# Altium PCB PWB.PcbDoc (part 3 of 5)
Units mm, origin at the board's own origin, x right, y up, seen from the top; angles counter-clockwise.
Board outline 202 x 125 mm, 2 copper layers (Top Layer, Bottom Layer), stack 1.576 mm thick; 208 components, 124 nets, 630 pads, 5440 vias.
Unrouted connection lines stored in the file: 98.
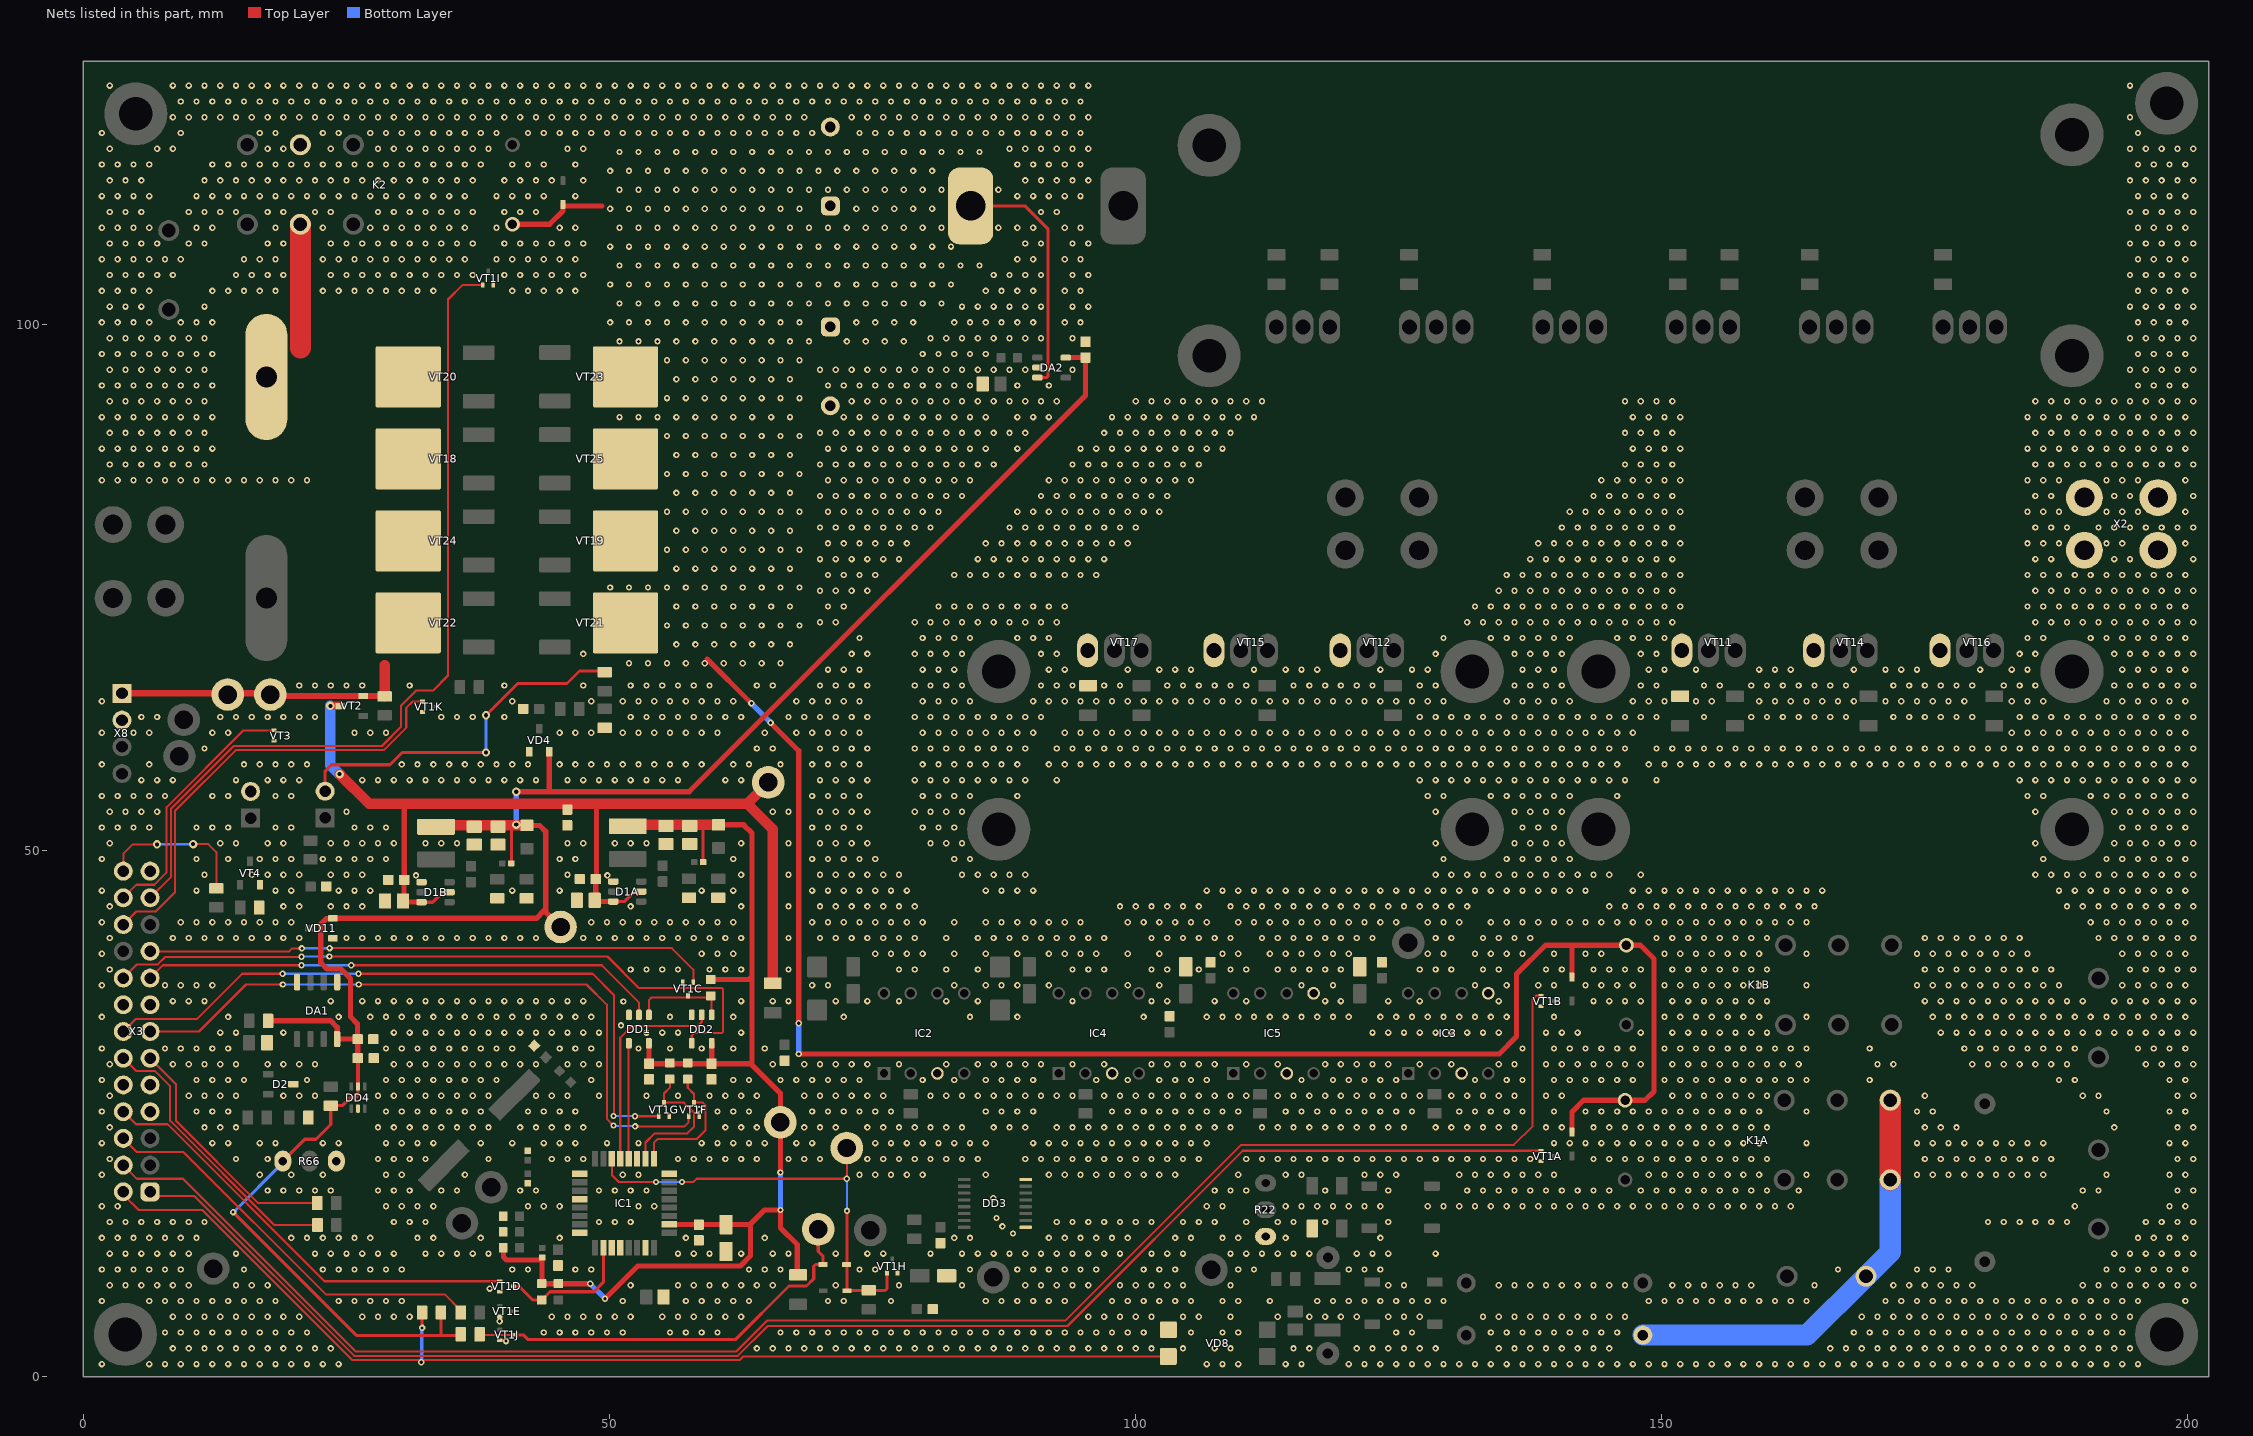
[diagram p2: the nets of this part, all layers, seen from the top]

## Part data (continued)
R31: library part RC0805JR-073K3L, "3.3 kOhms ±5%, 1/8W 0805 Thick Film Resistor", Manufacturer=Yageo, Package=0805, Power Rating=0.125W, Temperature Range="-55°C ~ 155°C", Temperature Stability=±100ppm/°C, Tolerance=±1%, Voltage=150V, Ajax_1C_ID=9030, Ajax_1C_PN="3.3k 5% 0805 Resistors SMD RoHS", Ajax_1С_Status="RND Only", Component Status=Released, Component Type=SMD, ComponentLink1Description=Datasheet, ComponentLink1URL=https://eu.mouser.com/datasheet/2/447/PYu_RC_Group_51_RoHS_L_10-1664068.pdf, GUID_1C=cb9785ec-9b47-11e6-8242-d8cb8a9acc66, Part Number=RC0805JR-073K3L, Part Type="Thick Film", Price=0,001081, Replacement=NONE
R34 R35 R36 R38 R39 R40 R45 R46 R47 R48 R49 R50: library part RC1206FR-074R7L, "4.7 Ohms ±1%, 1/4W 1206 Thick Film Resistor", Manufacturer=Yageo, Package=1206, Power Rating=0.25W, Supplier Part Number 1=311-4.70FRTR-ND, Temperature Range="-55°C ~ 155°C", Temperature Stability=±200ppm/°C, Tolerance=±1%, Voltage=200V, Ajax_1C_ID=32212, Ajax_1C_PN="4.7R 1% 1206 0.25W Resistors SMD RoHS", Ajax_1С_Status="Mass Production", Component Status=Released, Component Type=SMD, ComponentLink1Description=Datasheet, ComponentLink1URL=https://eu.mouser.com/datasheet/2/447/PYu_RC_Group_51_RoHS_L_11-1984063.pdf, GUID_1C=de4b8aaa-eaef-11eb-ab74-0050569f2651, Part Number=RC1206FR-074R7L, Part Type="Thick Film", Price=0,0021, Replacement=NONE, Supplier 1=Digi-Key
R37 R41 R51 R52: library part RC1206JR-0710KL, "10 kOhms ±5% 1/4W 1206 Thick Film Resistor", Manufacturer=Yageo, Package=1206, Power Rating=0.25W, Supplier Part Number 1=311-10KERTR-ND, Temperature Range="-55°C ~ 155°C", Temperature Stability=±100ppm/°C, Tolerance=±5%, Voltage=200V, Ajax_1C_ID=29423, Ajax_1C_PN="10k 5% 1206 Resistors SMD RoHS", Ajax_1С_Status="RND Only", Component Status=Released, Component Type=SMD, ComponentLink1Description=Datasheet, ComponentLink1URL=https://eu.mouser.com/datasheet/2/447/PYu_RC_Group_51_RoHS_L_11-1984063.pdf, GUID_1C=e3e7c694-a8f0-11eb-ab74-0050569f2651, Part Number=RC1206JR-0710KL, Part Type="Thick Film", Price=0,0018, Replacement=NONE, Supplier 1=Digi-Key
R42: library part RC0805FR-071KL, "1 kOhms ±1%, 1/8W 0805 Thick Film Resistor", Manufacturer=Yageo, Package=0805, Power Rating=0.125W, Supplier Part Number 1=311-1.00KCRTR-ND, Temperature Range="-55°C ~ 155°C", Temperature Stability=±100ppm/°C, Tolerance=±1%, Voltage=150V, Ajax_1C_ID=8520, Ajax_1C_PN="1k 1% 0805 Resistors SMD RoHS", Ajax_1С_Status="Mass Production", Component Status=Released, Component Type=SMD, ComponentLink1Description=Datasheet, ComponentLink1URL=https://eu.mouser.com/datasheet/2/447/PYu_RC_Group_51_RoHS_L_10-1664068.pdf, GUID_1C=0c53a8ec-2890-11e6-81ae-d8cb8a9acc66, Part Number=RC0805FR-071KL, Part Type="Thick Film", Price=0,0014, Replacement=NONE, Supplier 1=Digi-Key
R44: library part RC0603JR-071KL, "1 kOhms ±5%, 1/10W 0603 Thick Film Resistor", Manufacturer=Yageo, Package=0603, Power Rating=0.1W, Supplier Part Number 1=311-1.0KGRTR-ND, Temperature Range="-55°C ~ 155°C", Temperature Stability=±100ppm/°C, Tolerance=±5%, Voltage=75V, Ajax_1C_ID=28124, Ajax_1C_PN="1k 5% 0603 Resistors SMD RoHS", Ajax_1С_Status="Mass Production", Component Status=Released, Component Type=SMD, ComponentLink1Description=Datasheet, ComponentLink1URL=https://eu.mouser.com/datasheet/2/447/PYu_RC_Group_51_RoHS_L_11-1984063.pdf, GUID_1C=fbc5fd6b-8d66-11eb-ab70-0050569f2651, Part Number=RC0603JR-071KL, Part Type="Thick Film", Price=0,00072, Replacement=NONE, Supplier 1=Digi-Key
R53 R54: library part RC1206JR-070RL, "0 Ohms Jumper, 1/4W 1206 Thick Film Resistor", Manufacturer=Yageo, Package=1206, Power Rating=0.25W, Supplier Part Number 1=311-0.0ERTR-ND, Temperature Range="-55°C ~ 155°C", Temperature Stability=NONE, Tolerance=±5%, Voltage=200V, Ajax_1C_ID=5515, Ajax_1C_PN="0R 5% 1206 Resistors SMD RoHS", Ajax_1С_Status="Mass Production", Component Status=Released, Component Type=SMD, ComponentLink1Description=Datasheet, ComponentLink1URL=https://eu.mouser.com/datasheet/2/447/PYu_RC_Group_51_RoHS_L_10-1664068.pdf, GUID_1C=96b6e750-6b2e-11e4-9c1d-a45d36c4a9e5, Part Number=RC1206JR-070RL, Part Type="Thick Film", Price=0,0018, Replacement=NONE, Supplier 1=Digi-Key
R56 R57: library part MOR200SJTB-10R, "150k Ohm ±5%, 2W d4.0mm L11mm Axial Through Hole, Metal Oxide Resistor, Al2O3", Manufacturer=Hitano, Package="Axial 4.0mm, L11mm", Power Rating=2W, Supplier Part Number 1=13878, Temperature Range="-55°C ~ 200°C", Temperature Stability=±250ppm/°C, Tolerance=±5%, Voltage=500V, Ajax_1C_ID=17914, Ajax_1C_PN="150k 5% 2W (MOR200SJTB-10R-Hitano) резистор выводной pcs", Ajax_1С_Status="RND Only", Component Status=Released, Component Type=PTH, ComponentLink1Description=Datasheet, ComponentLink1URL=\\altiumdb.ajax.local\files\Datasheet\Passive\MOR_20160329.pdf, GUID_1C=857e103f-078d-11ea-ab58-0050569f2651, Part Number=MOR200SJTB-10R, Part Type="Metal Oxide Film", Price=0,05250406, Replacement=NONE, Supplier 1=RKS
R60: library part ERJ-P06J121V, "120 Ohms ±5%, 1/2W 0805 Thick Film Resistor", Manufacturer=Yageo, Package=0805, Power Rating=0.5W, Supplier Part Number 1=P120ADTR-ND, Temperature Range="-55°C ~ 155°C", Temperature Stability=±200ppm/°C, Tolerance=±5%, Voltage=400V, Ajax_1C_ID=19445, Ajax_1C_PN="120R 5% 1/2W 0805 ERJ-P06J121V Panasonic Resistors SMD RoHS", Ajax_1С_Status="Mass Production", Component Status=Released, Component Type=SMD, ComponentLink1Description=Datasheet, ComponentLink1URL=https://industrial.panasonic.com/cdbs/www-data/pdf/RDO0000/AOA0000C331.pdf, GUID_1C=e6cc71c1-57d9-11ea-ab5b-0050569f2651, Part Number=ERJ-P06J121V, Part Type="Thick Film / Anti-Surge/Pulse Withstanding", Price=0,02100084, Replacement=NONE, Supplier 1=Digi-Key
TP1 TP2: "0.96mm Pad for Plug-In or Receptacle", Manufacturer=NONE, Ajax_1C_PN=NONE, Ajax_1С_Status="RND Only", Component Status=Released, Component Type=PTH, ComponentLink1Description=Datasheet, ComponentLink1URL=NONE, Part Number=PAD-0.96mm, Part Type=Pad, Price=NONE, Replacement=NONE, Temperature Range=NONE
VD1 VD7: "1A, 600V Standard Bridge Rectifier, ABS Package", Current=1A, Manufacturer="Taiwan Semiconductor", Package=ABS, Supplier Part Number 1=821-ABS6H, Temperature Range="-55°C ~ 150°C", Voltage=600V, Ajax_1C_ID=34652, Ajax_1C_PN="ABS6H 600V 1A Bridge Rectifier LGE ABS", Ajax_1С_Status="RND Only", Component Status=Released, Component Type=SMD, ComponentLink1Description=Datasheet, ComponentLink1URL="\\altiumdb.ajax.local\files\Datasheet\Diodes\ABS2 SERIES_M2103.pdf", GUID_1C=734c9af7-1f64-11ec-ab76-0050569f2651, Marking=ABS6H, Part Number=ABS6H, Part Type=Array, Price=0,0254, Replacement=NONE, Supplier 1=Mouser, Vf="0.95V @ 0.4A"
VD2 VD3: "Diode Schottky 10V 3A, SOD-323", Current=3A, Manufacturer=STMicroelectronics, Package=SOD-323, Supplier Part Number 1=497-3707-2-ND, Temperature Range="-65°C ~ 150°C", Voltage=10V, Ajax_1C_ID=4777, Ajax_1C_PN="BAT60JFILM SOD-323 ST Диод", Ajax_1С_Status="Mass Production", Component Status=Released, Component Type=SMD, ComponentLink1Description=Datasheet, ComponentLink1URL=http://www.st.com/content/ccc/resource/technical/document/datasheet/3d/d2/27/1d/20/e3/4d/48/CD00001944.pdf/files/CD00001944.pdf/jcr:content/translations/en.CD00001944.pdf, GUID_1C=a9f1f773-fd28-11e3-b679-a45d36c4a9e5, Marking=60, Part Number=BAT60JFILM, Part Type=Schottky, Price=0, Replacement=NONE, Standard Lead Time="17 Weeks", Supplier 1=Digi-Key, Vf="580mV @ 1A"
VD4 VD11: "Diode Array 1 Pair Series Connection Standard 85V 160mA, 5nA Reverse Current, SOT-23", Current=160mA, Manufacturer="Diodes Incorporated", Package=SOT-23, Supplier Part Number 1=621-BAV199-F, Temperature Range="-65°C ~ 150°C", Voltage=85V, Ajax_1C_ID=25391, Ajax_1C_PN="BAV199-7-F (SOT-23) диод", Ajax_1С_Status="RND Only", Component Status=Released, Component Type=SMD, ComponentLink1Description=Datasheet, ComponentLink1URL=https://eu.mouser.com/datasheet/2/115/DIOD_S_A0008363444_1-2543096.pdf, GUID_1C=0951ac93-5400-11eb-ab6e-0050569f2651, Marking=K52, Part Number=BAV199-7-F, Part Type=Array, Price=0,022, Replacement=NONE, Standard Lead Time="30 Weeks", Supplier 1=Mouser, Vf="1.25V @ 150 mA"
VD5 VD6: "Diode Standard 1000V 1A, 75ns, SMA", Current=1A, Manufacturer="Diodec Semiconductor", Package=SMA, Temperature Range="-50°C ~ 150°C", Voltage=1000V, Ajax_1C_ID=20461, Ajax_1C_PN="US1M-DIO 1.0A 1000V 75ns, диод", Ajax_1С_Status="Mass Production", Component Status=Released, Component Type=SMD, ComponentLink1Description=Datasheet, ComponentLink1URL=https://diotec.com/request/datasheet/us1a.pdf, GUID_1C=3d137b04-96a6-11ea-ab61-0050569f2651, Marking=US1M, Part Number=US1M, Part Type=General, Price=0,02875902, Replacement=NONE, Supplier 1=Arrow, Supplier Part Number 1=US1M, Vf="1.7V @ 1A"
VD8: "1-Channel Photocoupler, 5kV, 130-260% CTR, SSOP-4", Color=NONE, Manufacturer="Everlight Electronics", Package=SSOP-4, Temperature Range="-55°C ~ 110°C", Ajax_1C_ID=34526, Ajax_1C_PN="EL817S1(B)(TU)-F Optocoupler IC Everlight SMD-4", Ajax_1С_Status="RND Only", Component Status="On Review", Component Type=SMD, ComponentLink1Description=Datasheet, ComponentLink1URL=\\altiumdb.ajax.local\files\Datasheet\Opto\el817-Everlight.pdf, GUID_1C=2965953f-1c55-11ec-ab76-0050569f2651, Part Number=EL817S1(B)(TU)-F, Part Type=Optocoupler, Price=0,04209091, Replacement=NONE, Supplier 1=Arrow, Supplier Part Number 1=EL817S1(B)(TU)-F, Wavelength=NONE
VD9A VD9B VD14: "Diode Standard 75V 150mA, SOD-323F", Current=150mA, Manufacturer="Diodec Semiconductor", Package=SOD-323, Supplier Part Number 1=1N4148WS-DIO, Temperature Range="-55°C ~ 150°C", Voltage=75V, Ajax_1C_ID=10255, Ajax_1C_PN="1N4148WS diotec SOD-323", Ajax_1С_Status="Mass Production", Component Status=Released, Component Type=SMD, ComponentLink1Description=Datasheet, ComponentLink1URL=https://diotec.com/tl_files/diotec/files/pdf/datasheets/1n4148ws.pdf, GUID_1C=3d8ac204-519f-11e7-8106-14dda9d2d04d, Marking=W2, Part Number=1N4148WS, Part Type="Fast Switching", Price=0,00864, Replacement=1N4148WS-E, Standard Lead Time=NONE, Supplier 1=TME, Vf="1V @ 50mA"
VD10: "Zener Diode 5.1V, 1W, ±5%, 5uA Reverse Current, DO-213AB", Manufacturer="Vishay Semiconductor", Package=DO-213AB, Supplier Part Number 1=625-ZM4757A, Temperature Range="-65°C ~ 175°C", Voltage=5.1V, Ajax_1C_ID=43362, Ajax_1C_PN="ZM4757A-GS08 стабилитрон 2,6*5,2 51V 1W", Ajax_1С_Status="Mass Production", Component Status=Released, Component Type=SMD, ComponentLink1Description=Datasheet, ComponentLink1URL=https://eu.mouser.com/datasheet/2/427/zm4728a-1767906.pdf, GUID_1C=ea8fe24c-db72-11ec-a361-005056994834, Part Number=ZM4757A-GS08, Part Type=Zener, Price=0,07370924, Replacement=NONE, Standard Lead Time="27 Weeks", Supplier 1=Mouser
VT1A VT1B VT1C VT1D VT1E VT1F VT1G VT1H VT1I VT1J VT1K VT3: "50V, 100mA Low Vce(sat) NPN Digital Transistor, Pre-Biased 4.7k/47k (with built-in resistors)", Manufacturer=Onsemi, Package=SC-75, Supplier Part Number 1=DTC143ZET1GOSTR-ND, Temperature Range="-55°C ~ 150 °C", Ajax_1C_ID=9410, Ajax_1C_PN="DTC143ZET1G SC-75-3  биполярный NPN транзистор", Ajax_1С_Status="Mass Production", Component Status=Released, Component Type=SMD, ComponentLink1Description=Datasheet, ComponentLink1URL=http://www.onsemi.com/pub/Collateral/DTC143Z-D.PDF, GUID_1C=d76ac5d5-de69-11e6-829b-d8cb8a9acc66, Ic=100mA, Part Number=DTC143ZET1G, Part Type=NPN, Price=0,0125, Replacement=NONE, Standard Lead Time="8 Weeks", Supplier 1=Digi-Key, Vce=50V
VT2: "-30V, -3.6A max P-Channel HEXFET MOSFET, 82mOhm @ Vgs = -4.5V", Manufacturer="Infineon Technologies", Package=SOT-23, Temperature Range="-55°C ~ 150°C", Ajax_1C_ID=18293, Ajax_1C_PN="IRLML9301TRPBF SOT-23-3", Ajax_1С_Status="RND Only", Component Status=Released, Component Type=SMD, ComponentLink1Description=Datasheet, ComponentLink1URL=https://eu.mouser.com/datasheet/2/196/Infineon_IRLML9301_DataSheet_v01_01_EN-1732998.pdf, GUID_1C=9e524eff-1dcc-11ea-ab59-0050569f2651, Id=3.6A, Part Number=IRLML9301TRPbF, Part Type=P-Channel, Price=0,12469714, RDS=103mOhm, Replacement=NONE, Standard Lead Time="77 Weeks", Supplier 1=Mouser, Supplier Part Number 1=IRLML9301TRPbF, Vds=30V
VT4: library part IRLML6344TRPBF, "30V, 5A max N-Channel HEXFET MOSFET, 29mOhm @ Vgs = 4.5V", Manufacturer="Infineon Technologies", Package=SOT-23, Supplier Part Number 1=IRLML6344TRPBFTR-ND, Temperature Range="-55°C ~ 150°C", Ajax_1C_ID=9416, Ajax_1C_PN="IRLML6344TRPBF  SOT23. полевой транзистор", Ajax_1С_Status="RND Only", Component Status=Released, Component Type=SMD, ComponentLink1Description=Datasheet, ComponentLink1URL=https://www.infineon.com/dgdl/irlml6344pbf.pdf?fileId=5546d462533600a4015356689c44262c, GUID_1C=8299d48f-df0c-11e6-829c-d8cb8a9acc66, Id=5A, Part Number=IRLML6344TRPBF, Part Type=N-Channel, Price=0,11485255, RDS=37mOhm, Replacement=NONE, Standard Lead Time="16 Weeks", Supplier 1=Digi-Key, Vds=30V
VT6 VT7 VT8 VT9 VT10 VT11 VT12 VT13 VT14 VT15 VT16 VT17: library part MOSFET_N_123, CurrentDS=7A, InputCapacitor=756pF, Manufacturer="Infineon Technologies", MaxPower=2.5W, Package=8-TDSON, PartNumber=IRFXXX, Temperature=-55...+150°C, VoltageDS=80V, GateCharge=9.1nC, HelpURL=https://www.digikey.com/product-detail/en/infineon-technologies/BSC340N08NS3GATMA1/BSC340N08NS3GATMA1TR-ND/2080655, RDS=34mOhm, TypeTransistor="MOSFET N-channel transistor", ValueManufacturerPartNumber="MOSFET N-channel transistor, 80V, 7A, 9.1nC, 2.5W, 34mOhm, 756pF, 8-TDSON, -55...+150°C"
VT18 VT19 VT20 VT21 VT22 VT23 VT24 VT25: "-40V, -7.2A max P-Channel Enhancement MOSFET, 59mOhm @ Vgs = -4.5V", Manufacturer="Diodes Incorporated", Package=D-Pak, Supplier Part Number 1=DMP4051LK3-13DITR-ND, Temperature Range="-55°C ~ 150°C", Ajax_1C_ID=18605, Ajax_1C_PN="DMP4051LK3 40V, 0,05Ohm P-chanel Power HEXFET", Ajax_1С_Status="Mass Production", Component Status=Released, Component Type=SMD, ComponentLink1Description=Datasheet, ComponentLink1URL=https://www.diodes.com/assets/Datasheets/DMP4051LK3.pdf, GUID_1C=9abe91dd-36a9-11ea-ab5a-0050569f2651, Id=7.2A, Part Number=DMP4051LK3-13, Part Type=P-Channel, Price=0,1628, RDS=85mOhm, Replacement=NONE, Standard Lead Time="30 Weeks", Supplier 1=Digi-Key, Vds=40V
X1 X2 X5 X6: library part Connector_single_power, TypeConnector="Power connector", ValueManufacturerPartNumber="Power connector, *, *"
  X1: CommentText="АКБ +"
  X2: CommentText="АКБ -"
  X5: CommentText=TR1
X3: "2.54mm Vertical Box Header, Two Rows, 26 Pin, 20mOhm max, Male IDC BH-26", Manufacturer=Connfly, Temperature Range="-40°C ~ 105°C", Ajax_1C_ID=14527, Ajax_1C_PN="BH-26 : Вилка в плату IDC : IDC-26", Ajax_1С_Status="RND Only", Component Status=Released, Component Type=PTH, ComponentLink1Description=Datasheet, ComponentLink1URL=\\altiumdb.ajax.local\files\Datasheet\Connectors\DS1013.pdf, GUID_1C=b61e51fd-0757-11e9-ab4d-0050569f2651, Part Number=DS1013-26SSIB1-3A, Part Type="IDC (Box Header) / Vertical", Price=0,1, Replacement=NONE
X4 X7 X9 X12: library part DG300-7.5-02P-11-00AH, "Screw Terminal, 7.5mm Pitch, 2 pin, Grey", Manufacturer=Degson, Supplier Part Number 1=DG300-7.5-2P11, Temperature Range="-30°C ~ 120°C", Ajax_1C_ID=14664, Ajax_1C_PN=DG300-7.5-02P-11-00AH, Ajax_1С_Status="RND Only", Component Status=Released, Component Type=PTH, ComponentLink1Description=Datasheet, ComponentLink1URL=https://www.tme.eu/Document/adcdc895102d44b158b752608cb08ff1/DG300-5.0.pdf, GUID_1C=80a5b435-17ec-11e9-ab4d-0050569f1984, Part Number=DG300-7.5-02P-11-00AH, Part Type=Terminal, Price=0,108, Replacement=NONE, Supplier 1=TME
X8: library part CI3104P1V00, "WH Series 2.54mm Wire to Board Straight DIP Type Headers, 4 Pin", Manufacturer=CviLux, Temperature Range="-25℃ ~ 85℃", Ajax_1C_ID=1232, Ajax_1C_PN="WF-04S, разъем 4 пина \"папа\", на плату", Ajax_1С_Status="RND Only", Component Status=Released, Component Type=PTH, ComponentLink1Description=Datasheet, ComponentLink1URL=\\altiumdb.ajax.local\files\Datasheet\Connectors\CI3102S.pdf, GUID_1C=2c368b74-dd41-11e0-af93-6c626deda1bb, Part Number=CI3104P1V00, Part Type="Wire-to-Board / Header", Price=0,01936, Replacement=NONE
X10 X11: library part CI3102P1V00, "WH Series 2.54mm Wire to Board Straight DIP Type Headers, 2 Pin", Manufacturer=CviLux, Temperature Range="-25℃ ~ 85℃", Ajax_1C_ID=6817, Ajax_1C_PN="WF-02S (DS1070-2M) Штекер \"папа\"; 2 контакта; шаг 2.54мм; прямой; на плату", Ajax_1С_Status="RND Only", Component Status=Released, Component Type=PTH, ComponentLink1Description=Datasheet, ComponentLink1URL=\\altiumdb.ajax.local\files\Datasheet\Connectors\CI3102S.pdf, GUID_1C=74812bc3-35d6-11e5-ad28-a45d36c4a9e5, Part Number=CI3102P1V00, Part Type="Wire-to-Board / Header", Price=0,016, Replacement=NONE
ZQ1: "12MHz, 18pF, ±30ppm, 40Ohm ESR, 1mW DL Crystal Quartz", Frequency=12MHz, Frequency Stability=±30ppm, Load Capacitance=18pF, Manufacturer="Cardinal Components Inc.", Supplier Part Number 1=370-1146-2-ND, Temperature Range="-40°C ~ 85 °C", Ajax_1C_ID=28125, Ajax_1C_PN="12.000 MHz 30ppm 18pF CSM4Z-A2B3C3-40-12.0D18 кварцевый резонатор", Ajax_1С_Status="RND Only", Component Status=Released, Component Type=SMD, ComponentLink1Description=Datasheet, ComponentLink1URL=https://www.cardinalxtal.com/uploads/files/csm4-csm5.pdf, Frequency Tolerance=±30ppm, GUID_1C=0d925abc-8d67-11eb-ab70-0050569f2651, Part Number=CSM4Z-A2B3C3-40-12.0D18, Part Type=Crystal, Price=0,505, Replacement=NONE, Standard Lead Time="8 Weeks", Supplier 1=Digi-Key
SH1: link=http://www.cnchog.com/products/40a-220a-ID167.html

## Free pads (board coordinates)
  round 6 hole 3.2: 0(4,4) 0(5,120) 0(87,52) 0(87,67) 0(107,97) 0(107,117) 0(132,52) 0(132,67) 0(144,52) 0(144,67) 0(189,52) 0(189,67) 0(189,97) 0(189,118) 0(198,4) 0(198,121)

## Via types
v1: diameter 0.6, hole 0.3, Top Layer to Bottom Layer, tented both sides, 5432 vias
v2: diameter 0.8, hole 0.4, Top Layer to Bottom Layer, tented both sides, 8 vias

## Nets (pads, with @x,y where several pads share a name; then routed paths per layer and width w, separated by ;. In a path a pad name is that pad's centre, name@x,y a point inside that pad or via, vN(x,y) a via of type N, cw(c..) or ccw(c..) an arc to the next point about the centre after c; other vN are vias at no path point)
3V3: C2.2 C4B.1 C5B.1 C35.2 C36.2 DA1.8 DA2.5 DD4.5 FP3.1 HG1B.AN L1B.2 R5.2 R16.1 R17.1 R19.1 R55.1 R66.1 VD4.2 VD11.2 | length 202
  Top Layer w0.3: v1(14.249,15.621) 25.959,3.912 33.96,3.912 ; R66.1@18.974,20.472 21.057,22.555 22.123,22.555 23.52,23.952 R16.1@23.52,25.745 24.627,25.745 25.375,26.492 25.883,26.492 26.111,26.721 DD4.5@26.111,27.568 ; L1B.2@33.528,52.238 L1B.2@33.664,52.373 ; R55.1@33.996,6.096 33.996,3.948 33.96,3.912 ; R17.1@35.484,3.912 33.96,3.912 ; R17.1@35.87,4.004 R17.1@35.879,4.013 ; R5.2@40.653,48.84 40.691,48.878 40.691,52.373
  Top Layer w0.4: DD4.5@26.117,27.612 C36.2@26.117,30.232
  Top Layer w0.5: R19.1@17.551,33.822 23.506,33.822 24.13,33.198 DA1.8@24.13,32.073 C35.2@25.822,32.073 ; C35.2@26.047,32.055 C35.2@26.072,32.055 26.072,33.516 25.4,34.188 25.4,37.826 24.491,38.735 23.165,38.735 22.581,39.319 22.581,43.002 23.074,43.496 23.681,43.496 VD11.2@23.731,43.546 43.063,43.546 43.802,44.285 43.944,44.426 ; C35.2@26.098,32.029 C36.2@26.098,30.251 C36.2@26.117,30.232 ; v2(41.148,55.575) 44.247,55.575 ; HG1B.AN@42.166,52.375 43.382,52.375 43.944,51.813 43.944,44.426 ; VD4.2@44.282,59.377 44.282,55.611 44.247,55.575 ; FP3.1@45.364,42.723 43.944,44.144 43.944,44.426 ; DA2.5@93.378,96.835 95.248,96.835 C2.2@95.25,96.837 95.25,93.243 57.582,55.575 44.247,55.575
  Top Layer w1: L1B.2@33.664,52.373 37.16,52.373 39.421,52.373 40.691,52.373 41.148,52.373 HG1B.AN@42.164,52.373 HG1B.AN@42.166,52.375
  Bottom Layer w0.3: v1(14.249,15.621) 14.286,15.621 18.974,20.309 R66.1@18.974,20.472
  Bottom Layer w0.5: v2(41.148,52.451) v2(41.148,55.575)
5V: C4A.1 C5A.1 C7.1 C8.1 C29.2 C30.2 DD1.5 DD2.5 FB1.1 FP4.1 HG1A.AN IC1.26 L1A.2 R8.2 R9.2 R10.2 R11.2 R12.2 R13.2 R25.2 R53.2 | length 120.6
  Top Layer w0.2: C30.2@53.757,29.823 C30.2@53.848,29.731 ; C29.2@59.675,29.772 C29.2@59.715,29.731 ; 63.436,29.731 63.551,29.616
  Top Layer w0.3: R11.2@43.561,8.827 R11.2@43.599,8.865 ; L1A.2@51.746,52.293 L1A.2@51.881,52.429 ; 58.909,52.429 R8.2@58.909,48.933 ; R8.2@58.909,48.933 58.87,48.895 R8.2@58.909,48.933
  Top Layer w0.5: R25.2@39.916,12.243 39.939,12.22 39.939,11.367 40.231,11.074 43.366,11.074 43.552,11.26 43.567,11.26 FB1.1@43.612,11.305 ; R11.2@43.561,8.827 R10.2@45.161,8.827 45.168,8.82 48.177,8.82 v1(48.184,8.814) ; R11.2@43.599,8.865 FB1.1@43.599,11.074 ; v1(49.581,7.391) 52.697,10.507 62.45,10.507 63.424,11.481 63.424,14.441 ; C30.2@53.757,29.823 DD1.5@53.757,31.67 ; C30.2@53.848,29.731 55.753,29.731 57.379,29.731 59.766,29.731 63.436,29.731 ; IC1.26@55.673,14.459 55.682,14.45 58.487,14.45 C8.1@58.496,14.441 63.361,14.441 64.745,15.824 v1(66.269,15.824) 66.269,14.122 67.864,12.527 67.864,9.736 R53.2@67.945,9.655 ; R13.2@59.664,37.732 63.258,37.732 63.551,38.025 ; C29.2@59.726,29.772 DD2.5@59.726,31.67 ; HG1A.AN@60.382,52.429 62.76,52.429 63.551,51.638 63.551,38.025 ; v1(66.256,19.396) FP4.1@66.256,24.155 66.256,26.911 63.551,29.616 63.551,38.025
  Top Layer w1: L1A.2@51.881,52.429 55.378,52.429 57.639,52.429 58.909,52.429 59.366,52.429 HG1A.AN@60.382,52.429
  Bottom Layer w0.5: v1(48.184,8.814) 48.184,8.801 49.581,7.404 v1(49.581,7.391) ; v1(66.256,19.396) 66.262,19.39 66.262,15.831 v1(66.269,15.824)
12V: C3A.1 C3B.1 C16.1 C17A.2 C17B.2 D1A.3 D1A.5 D1B.3 D1B.5 FP2.1 R54.2 VT2.3 | length 96.6
  Top Layer w0.3: D1B.3@32.15,45.081 33.205,45.081 34.108,45.984 34.764,45.984 D1B.5@34.81,46.031 ; D1A.3@50.368,45.136 51.423,45.136 52.326,46.039 52.982,46.039 D1A.5@53.028,46.086
  Top Layer w0.5: C3B.1@30.39,45.201 30.49,45.301 C3B.1@30.49,45.38 ; C3B.1@30.486,45.384 C3B.1@30.49,45.38 ; C17B.2@30.49,47.207 C3B.1@30.49,45.38 ; C17B.2@30.505,47.347 30.505,54.432 ; D1B.3@32.14,45.091 30.779,45.091 C3B.1@30.49,45.38 ; C3A.1@48.608,45.256 48.708,45.356 C3A.1@48.708,45.435 ; C3A.1@48.704,45.439 C3A.1@48.708,45.435 ; C17A.2@48.708,47.263 C3A.1@48.708,45.435 ; C17A.2@48.778,47.263 48.778,54.432 ; D1A.3@50.358,45.146 48.997,45.146 C3A.1@48.708,45.435
  Top Layer w0.8: v2(23.495,63.729) VT2.3@24.402,63.729
  Top Layer w1: v2(24.359,57.252) 27.178,54.432 30.505,54.432 48.778,54.432 63.094,54.432 ; FP2.1@65.1,56.439 63.094,54.432 ; R54.2@65.532,37.316 65.532,51.994 63.284,54.242 63.094,54.432
  Bottom Layer w1: v2(23.495,63.729) 23.495,58.115 v2(24.359,57.252)
+V_BRIDGE: C12.1 C13.1 DA2.3 K1A.1 K1B.1 K2.1 R1.2 SH1.1 VD9A.CA VD9B.CA VD14.CA VT19.2 VT21.2 VT23.2 VT25.2 X10.2 | length 224.4
  Top Layer w0.3: X10.2@22.987,55.626 22.987,57.531 23.597,58.141 29.159,58.141 30.328,59.309 v2(38.278,59.309) ; v2(38.278,62.84) 41.3,65.862 45.974,65.862 47.168,67.056 49.439,67.056 R1.2@49.555,66.94 ; SH1.1@84.328,111.252 89.484,111.252 91.694,109.042 91.694,95.111 91.518,94.935 DA2.3@90.678,94.935
  Top Layer w0.5: K2.1@40.794,109.504 44.328,109.504 45.593,110.769 VD14.CA@45.593,111.247 ; VD14.CA@45.593,111.397 VD14.CA@45.593,111.247 ; 49.276,111.252 48.165,111.252 48.17,111.247 VD14.CA@45.593,111.247 ; 59.273,68.181 59.287,68.181 63.486,63.983 v1(63.5,63.983) ; v1(65.329,62.128) 67.996,59.461 v1(67.996,33.579) ; v1(67.996,30.658) 134.569,30.658 136.22,32.309 136.22,38.252 138.959,40.991 141.453,40.991 ; VD9A.CA@141.478,23.223 141.478,25.146 142.591,26.259 K1A.1@146.531,26.259 148.433,26.259 149.276,27.102 149.276,39.7 147.985,40.991 K1B.1@146.658,40.991 141.453,40.991 ; VD9B.CA@141.478,37.955 141.478,40.966 141.453,40.991
  Bottom Layer w0.3: v2(38.278,59.309) v2(38.278,62.84)
  Bottom Layer w0.5: v1(63.5,63.983) 63.5,63.97 65.329,62.141 v1(65.329,62.128) ; v1(67.996,30.658) v1(67.996,33.579)
  other v1: 51.872,67.78 53.672,67.78 55.472,67.78 57.272,67.78 59.072,67.78 60.872,67.78 62.672,67.78 64.472,67.78 66.272,67.78 56.372,69.58 58.172,69.58 59.972,69.58 61.772,69.58 63.572,69.58 65.372,69.58 67.172,69.58 55.472,71.38 57.272,71.38 59.072,71.38 60.872,71.38 62.672,71.38 64.472,71.38 66.272,71.38 68.072,71.38 56.372,73.18 58.172,73.18 59.972,73.18 61.772,73.18 63.572,73.18 65.372,73.18 67.172,73.18 50.072,74.98 51.872,74.98 53.672,74.98 55.472,74.98 57.272,74.98 59.072,74.98 60.872,74.98 62.672,74.98 64.472,74.98 66.272,74.98 68.072,74.98 56.372,76.78 58.172,76.78 59.972,76.78 61.772,76.78 63.572,76.78 65.372,76.78 67.172,76.78 55.472,78.58 57.272,78.58 59.072,78.58 60.872,78.58 62.672,78.58 64.472,78.58 66.272,78.58 68.072,78.58 56.372,80.38 58.172,80.38 59.972,80.38 61.772,80.38 63.572,80.38 65.372,80.38 67.172,80.38 55.472,82.18 57.272,82.18 59.072,82.18 60.872,82.18 62.672,82.18 64.472,82.18 66.272,82.18 68.072,82.18 56.372,83.98 58.172,83.98 59.972,83.98 61.772,83.98 63.572,83.98 65.372,83.98 67.172,83.98 55.472,85.78 57.272,85.78 59.072,85.78 60.872,85.78 62.672,85.78 64.472,85.78 66.272,85.78 68.072,85.78 56.372,87.58 58.172,87.58 59.972,87.58 61.772,87.58 63.572,87.58 65.372,87.58 67.172,87.58 55.472,89.38 57.272,89.38 59.072,89.38 60.872,89.38 62.672,89.38 64.472,89.38 66.272,89.38 68.072,89.38 50.972,91.18 52.772,91.18 54.572,91.18 56.372,91.18 58.172,91.18 59.972,91.18 61.772,91.18 63.572,91.18 65.372,91.18 67.172,91.18 55.472,92.98 57.272,92.98 59.072,92.98 60.872,92.98 62.672,92.98 64.472,92.98 66.272,92.98 68.072,92.98 56.372,94.78 58.172,94.78 59.972,94.78 61.772,94.78 63.572,94.78 65.372,94.78 67.172,94.78 55.472,96.58 57.272,96.58 59.072,96.58 60.872,96.58 62.672,96.58 64.472,96.58 66.272,96.58 68.072,96.58 50.972,98.38 52.772,98.38 54.572,98.38 56.372,98.38 58.172,98.38 59.972,98.38 61.772,98.38 63.572,98.38 65.372,98.38 67.172,98.38 68.972,98.38 72.572,98.38 74.372,98.38 76.172,98.38 77.972,98.38 50.072,100.18 51.872,100.18 53.672,100.18 55.472,100.18 57.272,100.18 59.072,100.18 60.872,100.18 62.672,100.18 64.472,100.18 66.272,100.18 68.072,100.18 73.472,100.18 75.272,100.18 77.072,100.18 78.872,100.18 50.972,101.98 52.772,101.98 54.572,101.98 56.372,101.98 58.172,101.98 59.972,101.98 61.772,101.98 63.572,101.98 65.372,101.98 67.172,101.98 68.972,101.98 70.772,101.98 72.572,101.98 74.372,101.98 76.172,101.98 77.972,101.98 79.772,101.98 81.572,101.98 50.072,103.78 51.872,103.78 53.672,103.78 55.472,103.78 57.272,103.78 59.072,103.78 60.872,103.78 62.672,103.78 64.472,103.78 66.272,103.78 68.072,103.78 69.872,103.78 71.672,103.78 73.472,103.78 75.272,103.78 77.072,103.78 78.872,103.78 80.672,103.78 82.472,103.78 50.972,105.58 52.772,105.58 54.572,105.58 56.372,105.58 58.172,105.58 59.972,105.58 61.772,105.58 63.572,105.58 65.372,105.58 67.172,105.58 68.972,105.58 70.772,105.58 72.572,105.58 74.372,105.58 76.172,105.58 77.972,105.58 79.772,105.58 81.572,105.58 83.372,105.58 85.172,105.58 50.072,107.38 51.872,107.38 53.672,107.38 55.472,107.38 57.272,107.38 59.072,107.38 60.872,107.38 62.672,107.38 64.472,107.38 66.272,107.38 68.072,107.38 69.872,107.38 71.672,107.38 73.472,107.38 75.272,107.38 77.072,107.38 78.872,107.38 80.672,107.38 82.472,107.38 50.972,109.18 52.772,109.18 54.572,109.18 56.372,109.18 58.172,109.18 59.972,109.18 61.772,109.18 63.572,109.18 65.372,109.18 67.172,109.18 68.972,109.18 70.772,109.18 72.572,109.18 74.372,109.18 76.172,109.18 77.972,109.18 79.772,109.18 81.572,109.18 86.972,109.18 50.072,110.98 51.872,110.98 53.672,110.98 55.472,110.98 57.272,110.98 59.072,110.98 60.872,110.98 62.672,110.98 64.472,110.98 66.272,110.98 68.072,110.98 73.472,110.98 75.272,110.98 77.072,110.98 78.872,110.98 80.672,110.98 50.972,112.78 52.772,112.78 54.572,112.78 56.372,112.78 58.172,112.78 59.972,112.78 61.772,112.78 63.572,112.78 65.372,112.78 67.172,112.78 68.972,112.78 70.772,112.78 72.572,112.78 74.372,112.78 76.172,112.78 77.972,112.78 79.772,112.78 81.572,112.78 86.972,112.78 50.072,114.58 51.872,114.58 53.672,114.58 55.472,114.58 57.272,114.58 59.072,114.58 60.872,114.58 62.672,114.58 64.472,114.58 66.272,114.58 68.072,114.58 69.872,114.58 71.672,114.58 73.472,114.58 75.272,114.58 77.072,114.58 78.872,114.58 80.672,114.58 50.972,116.38 52.772,116.38 54.572,116.38 56.372,116.38 58.172,116.38 59.972,116.38 61.772,116.38 63.572,116.38 65.372,116.38 67.172,116.38 68.972,116.38 70.772,116.38 72.572,116.38 74.372,116.38 76.172,116.38 77.972,116.38 79.772,116.38 81.572,116.38 83.372,116.38 85.172,116.38
+VBAT: F1.2 FP1.1 FP8.1 K2.5 R3.1 VT2.2 VT18.2 VT20.2 VT22.2 VT24.2 X8.1 | length 40
  Top Layer w0.6: X8.1@3.785,64.77 3.962,64.948 10.135,64.948 14.58,64.948 17.653,64.948 17.922,64.679 VT2.2@26.602,64.679 28.601,64.679 R3.1@28.651,64.629 ; VT22.2@30.685,71.628 VT22.2@30.885,71.628
  Top Layer w1: R3.1@28.651,64.629 28.651,67.589
  Top Layer w2: 20.634,97.755 K2.5@20.634,109.504
cCONNECT_CHARGER: VT1I.1 X3.23 | length 81.7
  Top Layer w0.2: X3.23@6.35,45.491 8.325,47.466 8.325,53.936 14.313,59.925 28.39,59.925 30.201,61.736 30.201,63.75 31.653,65.202 33.249,65.202 34.671,66.624 34.671,102.362 36.053,103.744 VT1I.1@37.981,103.744
cEN_12V: VT3.1 X3.24 | length 24.5
  Top Layer w0.2: X3.24@3.81,45.491 5.055,46.736 6.752,46.736 7.925,47.909 7.925,54.102 15.232,61.409 VT3.1@18.121,61.409
cEN_220V_OUT: VT1B.1 X3.4 | length 163.2
  Top Layer w0.2: X3.4@3.81,20.091 5.1,18.801 9.483,18.801 25.922,2.362 62.036,2.362 64.982,5.309 93.337,5.309 110.05,22.022 135.966,22.022 137.744,23.8 137.744,35.865 138.066,36.187 VT1B.1@138.542,36.187
cEN_BRIDGE_POWER: VT1K.1 X3.22 | length 42.8
  Top Layer w0.2: X3.22@3.81,42.951 5.055,44.196 6.883,44.196 8.725,46.037 8.725,53.771 14.479,59.525 28.555,59.525 30.701,61.67 30.701,63.543 31.31,64.152 VT1K.1@32.243,64.152
cEN_BYPASS: VT1A.1 X3.1 | length 146.7
  Top Layer w0.2: X3.1@6.35,17.551 6.748,17.154 10.565,17.154 25.756,1.962 62.201,1.962 65.047,4.809 93.544,4.809 110.19,21.455 VT1A.1@138.542,21.455
cEN_FAN: R4.2 X3.26 | length 14.6
  Top Layer w0.2: X3.26@3.81,48.031 3.81,49.682 4.699,50.571 v2(7.01,50.571) ; v2(10.439,50.597) 11.887,50.597 12.649,49.835 R4.2@12.649,46.391
  Bottom Layer w0.2: v2(7.01,50.571) 7.023,50.584 10.427,50.584 v2(10.439,50.597)
cEN_UART_EG: VT1C.1 X3.19 | length 53.8
  Top Layer w0.2: X3.19@6.35,40.411 19.583,40.411 19.863,40.691 v1(20.777,40.691) ; v1(23.419,40.716) 55.931,40.716 57.98,38.667 VT1C.1@57.98,37.48
  Bottom Layer w0.2: v1(20.777,40.691) 20.79,40.703 23.406,40.703 v1(23.419,40.716)
cPOWER_EN: R32.2 X3.12 | length 26.9
  Top Layer w0.2: X3.12@3.81,30.251 5.01,29.051 6.788,29.051 8.255,27.584 8.255,24.303 18.156,14.402 R32.2@22.265,14.402
cPOWER_STROB: R33.2 X3.11 | length 23.6
  Top Layer w0.2: X3.11@6.35,30.251 8.814,27.788 8.814,24.31 16.639,16.485 R33.2@22.239,16.485
dEXT_U_DET: R55.2 VD8.4 X3.2 | length 111.2
  Top Layer w0.2: X3.2@3.81,17.551 3.81,17.286 5.272,15.824 11.328,15.824 25.59,1.562 v1@32.131,1.562 ; v1(32.131,1.362) v1@32.131,1.562 ; VD8.4@103.123,1.905 62.71,1.905 62.367,1.562 v1@32.131,1.562
  Top Layer w0.3: R55.2@32.196,6.096 32.202,6.091 32.202,4.628 v1(32.207,4.623)
  Bottom Layer w0.3: v1(32.131,1.362) 32.169,1.401 32.169,4.585 v1(32.207,4.623)
dPOWER_STATE: R59.2 X3.6 | length 39
  Top Layer w0.2: X3.6@3.81,22.631 5.1,21.341 9.52,21.341 23.056,7.805 34.345,7.805 35.879,6.271 R59.2@35.879,6.096
DT0: VT1G.1 X3.14 | length 65.6
  Top Layer w0.2: X3.14@3.81,32.791 5.01,33.991 10.827,33.991 15.113,38.278 v1(18.948,38.278) ; v1(26.162,38.278) 48.412,38.278 50.435,36.255 50.435,24.806 v1(50.394,24.765) ; v1(52.435,24.74) 52.442,24.732 54.687,24.732 VT1G.1@54.694,24.725
  Bottom Layer w0.2: v1(18.948,38.278) v1(26.162,38.278) ; v1(50.394,24.765) 50.406,24.752 52.422,24.752 v1(52.435,24.74)
DT0_CTRL: IC1.2 R9.1 VT1G.3 | length 13.8
  Top Layer w0.2: IC1.2@53.435,20.697 53.435,22.244 54.305,23.114 57.404,23.114 58.039,23.749 58.039,25.058 57.073,26.025 VT1G.3@55.194,26.025 55.194,26.899 55.753,27.457 R9.1@55.753,28.256
DT1: VT1F.1 X3.13 | length 65.7
  Top Layer w0.2: X3.13@6.35,32.791 10.998,32.791 15.469,37.262 v1(18.974,37.262) ; v1(26.187,37.262) 47.828,37.262 49.759,35.331 49.759,24.486 v1(50.394,23.851) ; v1(52.451,23.774) 57.15,23.774 57.531,24.155 57.531,24.717 VT1F.1@57.539,24.725
  Bottom Layer w0.2: v1(18.974,37.262) v1(26.187,37.262) ; v1(50.394,23.851) 50.432,23.812 52.413,23.812 v1(52.451,23.774)
DT1_CTRL: IC1.1 R12.1 VT1F.3 | length 13
  Top Layer w0.2: IC1.1@54.235,20.697 54.235,22.231 54.585,22.581 58.293,22.581 59.131,23.419 59.131,25.781 58.888,26.025 VT1F.3@58.039,26.025 58.039,26.848 57.455,27.432 R12.1@57.455,28.256
EG_RX: DD1.2 X3.17 | length 49.6
  Top Layer w0.2: X3.17@6.35,37.871 7.57,39.091 v1(20.752,39.091) ; v1(25.476,39.091) 49.276,39.091 52.807,35.56 DD1.2@52.807,34.37
  Bottom Layer w0.2: v1(20.752,39.091) v1(25.476,39.091)
EG_RX_UART: DD1.4 IC1.4 | length 10.8
  Top Layer w0.2: IC1.4@51.835,20.697 DD1.4@51.835,31.521
EG_TX: DD2.4 X3.18 | length 67
  Top Layer w0.2: X3.18@3.81,37.871 5.105,39.167 7.08,39.167 7.774,39.861 20.72,39.861 v1(20.751,39.891) ; v1(23.39,39.917) 49.821,39.917 52.808,36.93 60.69,36.93 60.808,36.813 60.808,32.756 60.69,32.639 58.064,32.639 57.826,32.4 DD2.4@57.826,31.67
  Bottom Layer w0.2: v1(20.751,39.891) 20.763,39.904 23.378,39.904 v1(23.39,39.917)
EG_TX_UART: DD2.2 IC1.5 | length 20.6
  Top Layer w0.2: IC1.5@51.035,20.697 51.035,32.214 52.146,33.325 58.42,33.325 58.782,33.687 58.782,34.363 DD2.2@58.776,34.37
EN_PWM: FP5.1 IC1.6 R14.2 VD2.AN VD3.AN VT1H.1 | length 43.2
  Top Layer w0.2: IC1.6@50.235,20.697 50.235,19.158 50.902,18.491 v1(54.436,18.491) ; v1(56.911,18.491) 57.988,18.491 58.293,18.796 v1(72.568,18.796) FP5.1@72.568,21.717
  Top Layer w0.3: VD3.AN@72.55,10.643 72.572,10.664 72.572,15.726 v1(72.593,15.748) ; VD2.AN@72.575,8.153 VD3.AN@72.575,10.448 ; VD2.AN@72.575,8.18 76.21,8.18 76.386,8.355 VT1H.1@76.386,9.84 ; R14.2@74.563,8.277 R14.2@74.651,8.19
  Bottom Layer w0.2: v1(54.436,18.491) v1(56.911,18.491) ; v1(72.568,18.796) 72.581,18.783 72.581,15.761 v1(72.593,15.748)
EN_PWM_OCP: FP7.1 R17.2 VD3.CA VT1J.3 | length 40
  Top Layer w0.2: R17.2@37.679,4.013 37.73,3.962 VT1J.3@40.884,3.962
  Top Layer w0.3: VT1J.3@40.884,3.962 41.834,3.962 42.292,3.504 61.975,3.504 67.075,8.603 68.74,8.603 69.418,9.282 69.418,10.467 69.594,10.643 70.025,10.643 70.15,10.643 VD3.CA@70.3,10.643 70.3,11.437 69.85,11.887 FP7.1@69.85,13.995
EN_UART: DD1.1 DD2.1 R13.1 VT1C.3 | length 9.1
  Top Layer w0.2: DD1.1@53.757,34.37 53.757,35.773 54,36.017 57.48,36.017 59.608,36.017 59.726,35.9 DD2.1@59.726,34.37
EXT_AC_L: K1A.7 K1A.8 R56.1 X7.2 | length 41.2
  Top Layer w2: K1A.8@171.731,18.699 K1A.7@171.731,26.259
  Bottom Layer w2: R56.1@148.227,3.937 163.837,3.937 X7.2@169.425,9.525 171.731,11.831 K1A.8@171.731,18.699
FQSEL: VT1D.1 X3.8 | length 42.4
  Top Layer w0.2: X3.8@3.81,25.171 5.01,23.971 8.021,23.971 22.933,9.06 VT1D.1@39.584,9.06
FRQ_SEL: IC1.18 R11.1 VT1D.3 | length 13.1
  Top Layer w0.3: VT1D.3@40.884,8.56 41.453,8.56 42.736,7.277 R11.1@43.561,7.277 43.586,7.277 44.361,8.052 48.544,8.052 49.435,8.943 IC1.18@49.435,12.221
GND: C1.2 C2.1 C3A.2 C3B.2 C4A.2 C4B.2 C5A.2 C5B.2 C7.2 C8.2 C9.1 C10.2 C11.2 C12.2 C13.2 C15.2 C16.2 C17A.1 C17B.1 C18.2 C19.2 C20.2 C21.2 C23.2 C24.2 C26.2 C27.2 C28.1 C29.1 C30.1 C32.1 C33.2 C35.1 C36.1 C37.2 D1A.1 D1B.1 D2.3 DA1.1 DA1.4 DA2.2 DD1.3 DD2.3 DD3.1 DD3.8 DD4.2 IC1.3 IC1.9 IC1.12 IC1.16 IC1.19 IC1.20 IC1.23 IC1.32 IC2.3 IC3.3 IC3.5 IC4.3 IC5.3 IC5.5 K2.6 R2.2 R6A.2 R6B.2 R7A.2 R7B.2 R22.1 R23.1 R24.2 R26.2 R31.2 R44.1 R51.1 R52.1 R61.1 R66.3 VD4.1 VD8.3 VD11.1 VT1A.2 VT1B.2 VT1C.2 VT1D.2 VT1E.2 VT1F.2 VT1G.2 VT1H.2 VT1I.2 VT1J.2 VT1K.2 VT3.2 VT4.2 VT11.3 VT12.3 VT14.3 VT15.3 VT16.3 VT17.3 X2.1 X3.7 X3.9 X3.10 X3.15 X3.16 X3.25 X8.2 X11.2 | length 1.4
  Top Layer w0.2: VT1J.2@39.584,3.462 40.172,3.462 v1(40.172,3.362) ; v1(58.531,25.402) 58.535,25.398 58.535,24.728 VT1F.2@58.539,24.725

## Text inside footprints (layer, text, board x,y; h text height)
C7: Top Assembly "A" at 60.787,13.457 h0.7 r270; Top Assembly "+" at 61.787,14.757 h0.3 r270
C12: Top Assembly "+" at 72.85,110.95 h0.9 r90
C13: Top Assembly "+" at 69.15,100.05 h0.9 r270
C20: Top Assembly "A" at 105.075,37.368 h0.7 r90; Top Assembly "+" at 104.075,36.068 h0.3 r90
C21: Top Assembly "A" at 121.61,37.368 h0.7 r90; Top Assembly "+" at 120.61,36.068 h0.3 r90
C22: Top Assembly "+" at 73.877,39.268 h0.3 r270; Top Assembly "A" at 72.877,37.968 h0.7 r270
C25: Top Assembly "A" at 89.616,37.968 h0.7 r270; Top Assembly "+" at 90.616,39.268 h0.3 r270
C27: Top Assembly "A" at 80.472,9.276 h0.7; Top Assembly "+" at 79.172,10.276 h0.3
HG1A: Top Assembly "1" at 60.257,50.579 h0.3 r270; Top Assembly "2" at 60.257,52.229 h0.3 r270
HG1B: Top Assembly "1" at 42.039,50.523 h0.3 r270; Top Assembly "2" at 42.039,52.173 h0.3 r270
HG2: Top Assembly "A" at 45.976,28.14 h0.3 r315; Top Assembly "K" at 45.257,28.858 h0.3 r315
K1A: Top Assembly "NC" at 160.856,21.984 h1; Top Assembly "COM" at 165.356,21.934 h1; Top Assembly "NO" at 170.806,21.934 h1
K1B: Top Assembly "NC" at 160.983,36.716 h1; Top Assembly "COM" at 165.483,36.666 h1; Top Assembly "NO" at 170.933,36.666 h1
K2: Top Assembly "NC" at 26.469,113.779 h1 r180; Top Assembly "COM" at 21.969,113.829 h1 r180; Top Assembly "NO" at 16.519,113.829 h1 r180
VD1: Top Overlay "-" at 124.419,13.974 h0.8 r90; Top Overlay "+" at 124.377,17.424 h0.8 r90; Top Assembly "+" at 123.997,17.504 h0.6 r90; Top Assembly "-" at 124.004,14.104 h0.6 r90
VD7: Top Overlay "-" at 124.699,4.855 h0.8 r90; Top Overlay "+" at 124.656,8.305 h0.8 r90; Top Assembly "+" at 124.276,8.385 h0.6 r90; Top Assembly "-" at 124.283,4.985 h0.6 r90
VT18: Top Assembly "4" at 30.535,86.957 h0.7 r90; Top Assembly "3" at 34.985,89.257 h0.7 r90; Top Assembly "1" at 34.985,84.807 h0.7 r90
VT19: Top Assembly "4" at 51.881,79.672 h0.7 r270; Top Assembly "3" at 47.431,77.372 h0.7 r270; Top Assembly "1" at 47.431,81.822 h0.7 r270
VT20: Top Assembly "4" at 30.535,94.746 h0.7 r90; Top Assembly "3" at 34.985,97.046 h0.7 r90; Top Assembly "1" at 34.985,92.596 h0.7 r90
VT21: Top Assembly "4" at 51.881,71.878 h0.7 r270; Top Assembly "3" at 47.431,69.578 h0.7 r270; Top Assembly "1" at 47.431,74.028 h0.7 r270
VT22: Top Assembly "4" at 30.535,71.378 h0.7 r90; Top Assembly "3" at 34.985,73.678 h0.7 r90; Top Assembly "1" at 34.985,69.228 h0.7 r90
VT23: Top Assembly "4" at 51.881,95.26 h0.7 r270; Top Assembly "3" at 47.431,92.96 h0.7 r270; Top Assembly "1" at 47.431,97.41 h0.7 r270
VT24: Top Assembly "4" at 30.535,79.167 h0.7 r90; Top Assembly "3" at 34.985,81.467 h0.7 r90; Top Assembly "1" at 34.985,77.017 h0.7 r90
VT25: Top Assembly "4" at 51.881,87.466 h0.7 r270; Top Assembly "3" at 47.431,85.166 h0.7 r270; Top Assembly "1" at 47.431,89.616 h0.7 r270
X3: Top Overlay "1" at 7.155,15.666 h1.02 r90; Top Assembly "1" at 7.155,15.541 h1 r90; Top Assembly "26" at 4.305,49.441 h1 r90
X4: Top Assembly "1" at 193.891,28.654 h1 r90
X7: Top Assembly "1" at 160.226,7.15 h1
X9: Top Assembly "1" at 5.753,110.605 h1 r270
X12: Top Assembly "1" at 193.891,12.331 h1 r90